# Altium PCB Driver.PcbDoc (part 2 of 4)
Units mm, origin at the board's own origin, x right, y up, seen from the top; angles counter-clockwise.
Board outline 200.2 x 290.2 mm, 2 copper layers (Top Layer, Bottom Layer), stack 1.371 mm thick; 539 components, 196 nets, 1470 pads, 343 vias.
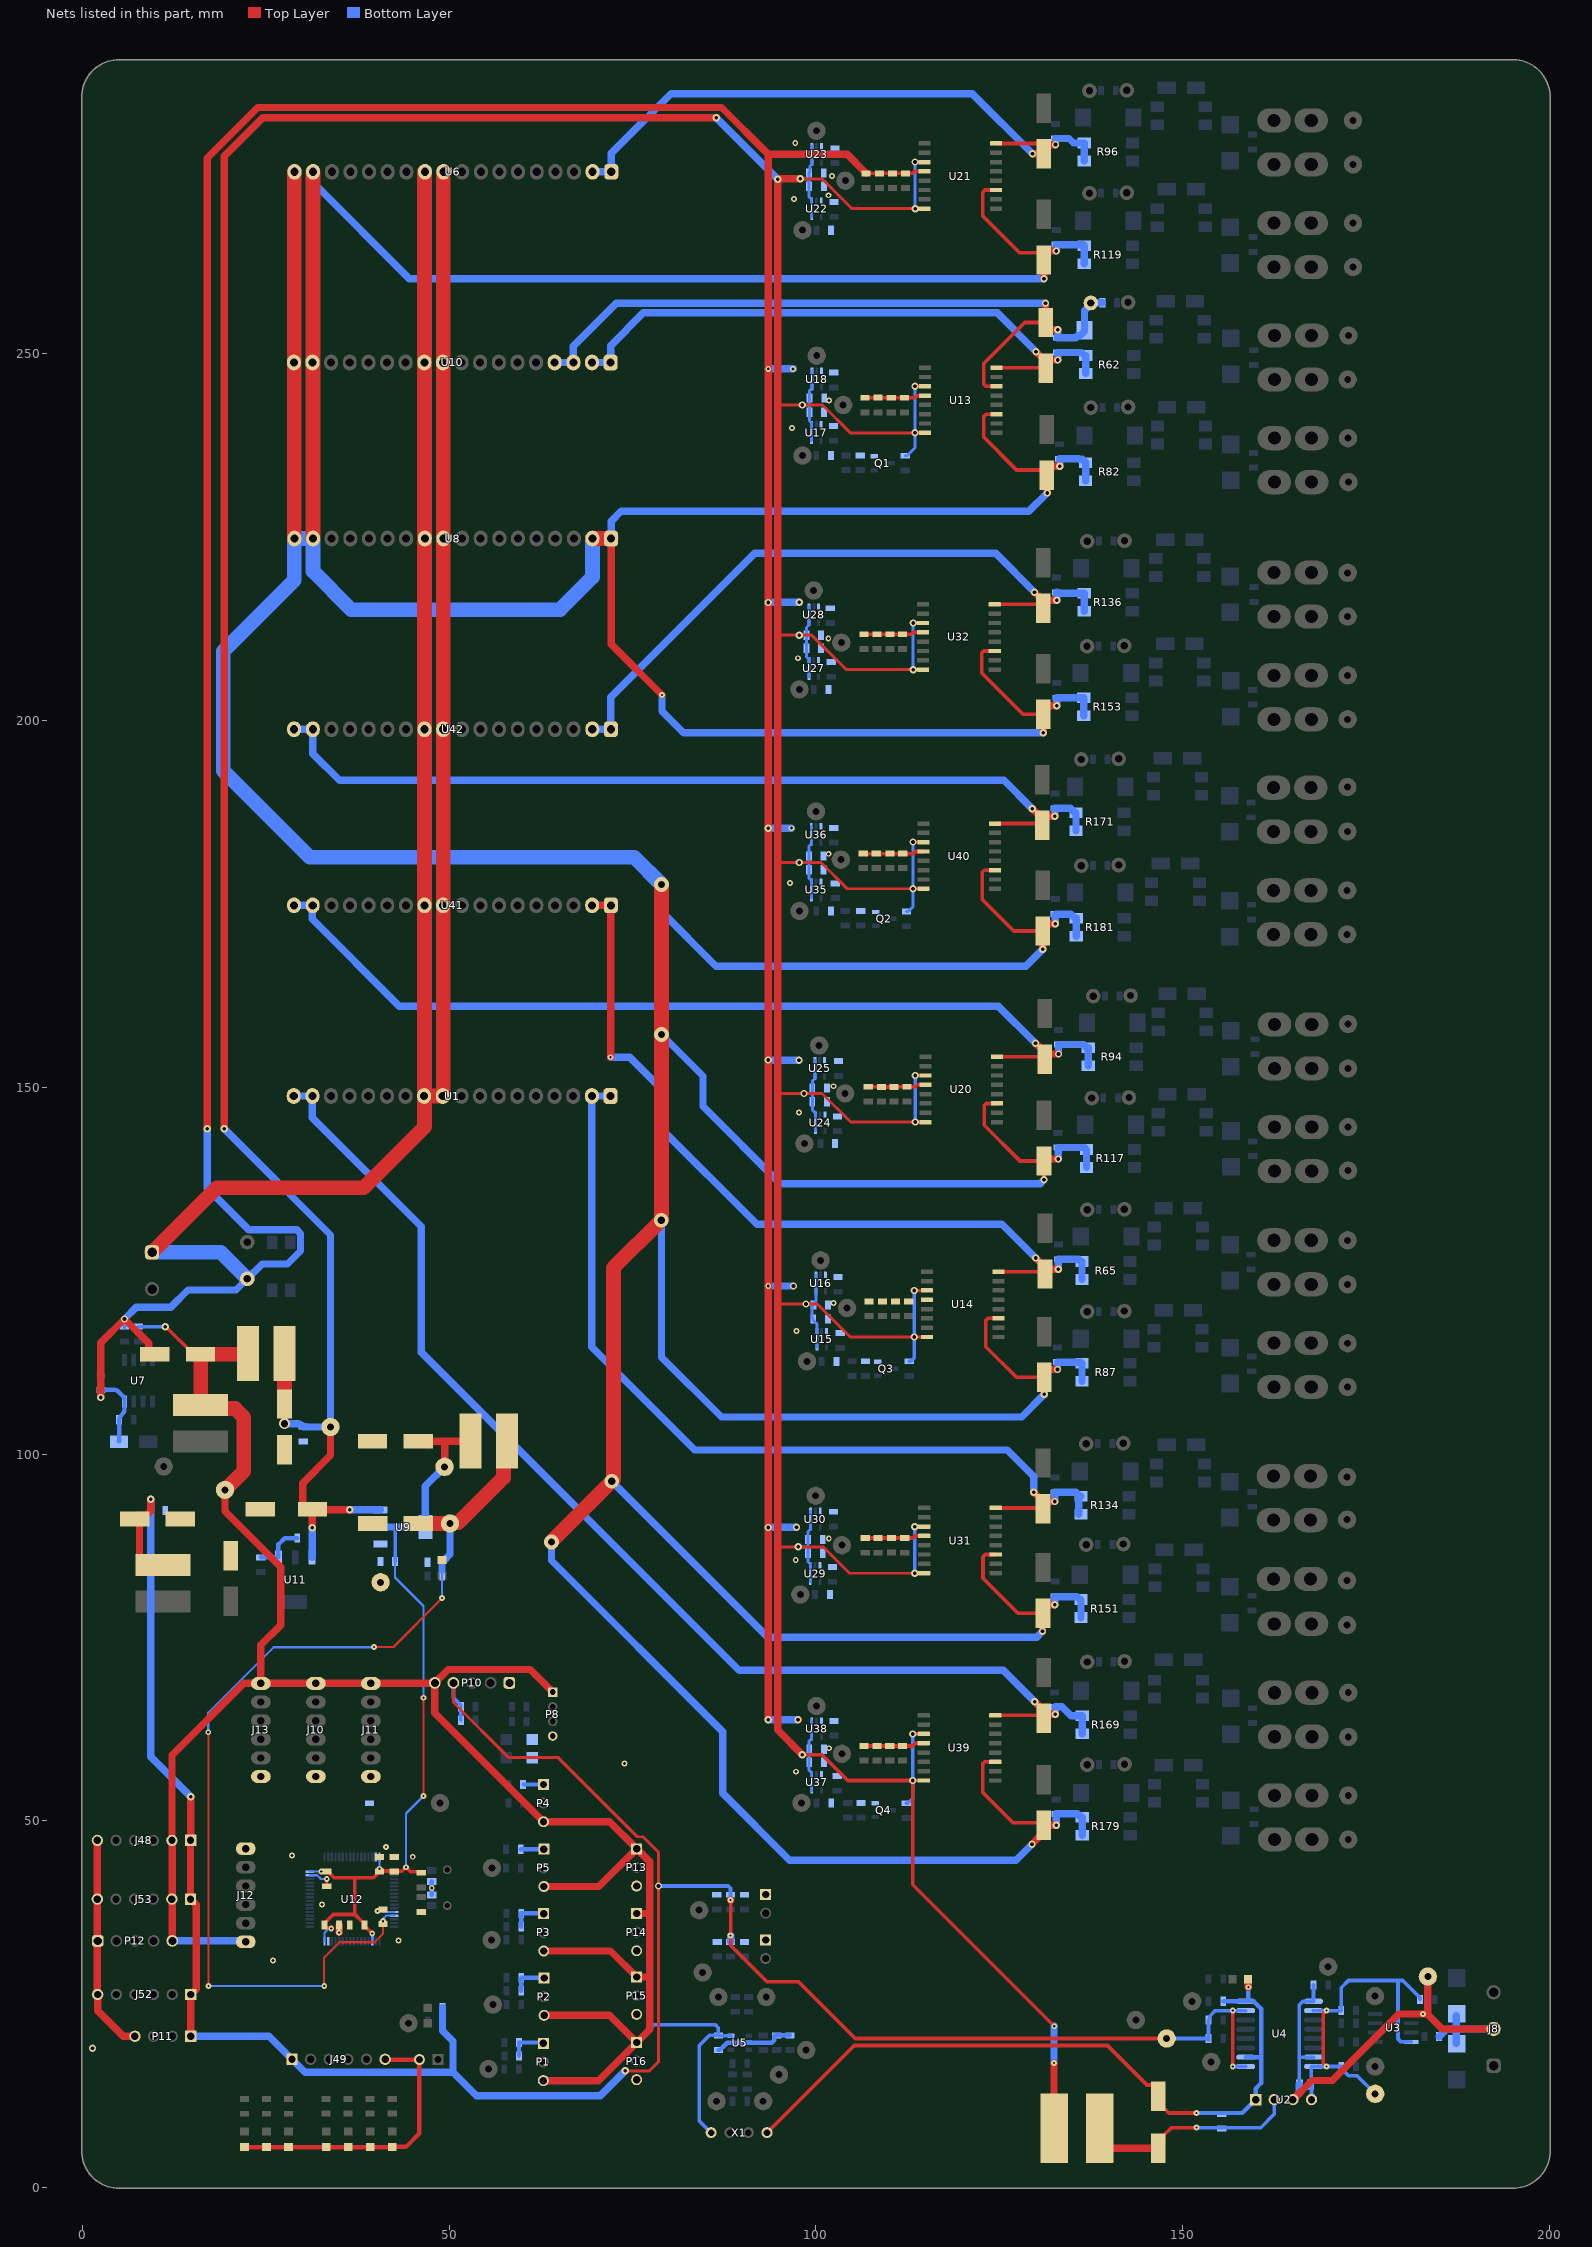
[diagram p2: the nets of this part, all layers, seen from the top]

## Part data
C1 C2 C3 C4 C5 C6 C7 C8 C10 C11 C12 C13 C14 C15 C16 C17 C18 C19 C25 C26 C27 C28 C29 C36 C40 C41 C42 C45 C46 C48 C52 C53 C54 C76 C81 C89 C127: library part CAP-NON-POLAR
C9: library part CMP-1036-04552-2, "CAP CER 0.22UF 50V X7R 0805", Capacitance="0.22 μF", Manufacturer=KEMET, Package=C0805C-DN, Temperature="-55°C to +125°C", Temperature Characteristic=X7R, Temperature Coefficient=30ppm/°C, Temperature Range High=+125°C, Temperature Range Low=-55°C, Tolerance=0.1, Voltage Rating="50 V", Automotive=No, Category=Cap, ComponentLink2Description=Datasheet, ComponentLink2URL=https://content.kemet.com/datasheets/KEM_C1003_C0G_SMD.pdf, Device Class L1="Passive Components", Device Class L2=Capacitors, Device Class L3="Ceramic Capacitors", Digikey Description="CAP CER 0.22UF 50V X7R 0805", Height=0.88mm, Ipc Land Pattern Name=CAPC200125X78, Lead Free=Yes, Manufacturer Part Number=C0805C224K5RACTU, Material=Ceramic, Mouser Description="CAP CER 0.22UF 50V X7R 0805", Octopart=https://octopart.com/c0805c224k5ractu-kemet-144670, RoHS=TRUE
C33 C43 C44 C47 C49 C50 C51 C58 C60 C71 C73 C87 C88 C103 C104 C114 C117 C137 C139 C148 C150 C168 C170: library part CAP-POLAR
C38 C39: library part CAP_POL_SMD
C55 C56: library part CMP-2007-03453-2, "Chip Multilayer Ceramic Capacitors for General Purpose, 0805, 16pF, X5R, 15%, 10%, 16V", Capacitance=10uF, Case Code (Imperial)=0805, Case Code (Metric)=2012, Dielectric=X5R, Max Operating Temperature=85°C, Min Operating Temperature=-55°C, Package Quantity=1, Tolerance=10%, Voltage=16V, Case/Package=0805, Depth=1.25mm, Height=1.25mm, Lead Free="Lead Free", Length=2mm, Material=Ceramic, Mount="Surface Mount", Packaging="Tape and Reel", Radiation Hardening=No, REACH SVHC="No SVHC", Termination=SMD/SMT, Thickness=0.053inch, Voltage Rating=16V, Voltage Rating (DC)=16V, Width=1.25mm
D1 D2 D3 D4 D5 D6 D7 D11 D22: library part LED, "WURTH ELEKTRONIK - 151031YS06000 - LED, Yellow, Through Hole, T-1 (3mm), 30 mA, 2 V, 590 nm", Manufacturer_Name="Wurth Elektronik", Mouser Part Number=710-151031YS06000, Datasheet Link=https://katalog.we-online.de/led/datasheet/151031YS06000.pdf, Geometry.Height=5.5mm, Manufacturer_Part_Number=151031YS06000, Mouser Price/Stock=https://www.mouser.co.uk/ProductDetail/Wurth-Elektronik/151031YS06000?qs=LlUlMxKIyB3xSYYW%252BcuBiQ%3D%3D
D8: "WURTH ELEKTRONIK - 151031YS06000 - LED, Yellow, Through Hole, T-1 (3mm), 30 mA, 2 V, 590 nm", Manufacturer_Name="Wurth Elektronik", Manufacturer_Part_Number=151031YS06000, Mouser Part Number=710-151031YS06000, Datasheet Link=https://katalog.we-online.de/led/datasheet/151031YS06000.pdf, Geometry.Height=5.5mm, Mouser Price/Stock=https://www.mouser.co.uk/ProductDetail/Wurth-Elektronik/151031YS06000?qs=LlUlMxKIyB3xSYYW%252BcuBiQ%3D%3D
J8: library part 691101710003, "WR-TBL Series 101 Horizontal Entry Modular, Through Hole, pitch 5mm, 3p", Manufacturer="Wurth Elektronik", Operating Temperature Max=105°C, Operating Temperature Min=-40°C, Rated Current=16A, Working Voltage=250V, Application="Pressure Clamp", Category="Terminal Blocks", ComponentLink1Description="Manufacturer Link", ComponentLink1URL=https://www.we-online.com/redexpert/article/691101710003?ad, ComponentLink2Description=Datasheet, ComponentLink2URL=https://www.we-online.com/redexpert/spec/691101710003?ad, Manufacturer Part Number=691101710003, Match Code=WR-TBL, Modularity=Yes, Mount="Through Hole", Orientation=Horizontal, Packaging=Box, PCB/Cable/Panel=PCB, Pin Number=3, Pitch=5mm
J9: "WR-TBL Series 101 Horizontal Entry Modular, THT, pitch 5mm, 2p", Manufacturer="Wurth Elektronik", Operating Temperature Max=105°C, Operating Temperature Min=-40°C, Rated Current=16A, Working Voltage=250V, Application="Pressure Clamp", Category="Terminal Blocks", ComponentLink1Description="Website Link", ComponentLink1URL=https://www.we-online.com/redexpert/article/691101710002?ad, ComponentLink2Description="Datasheet Link", ComponentLink2URL=https://www.we-online.com/redexpert/spec/691101710002?ad, Manufacturer Part Number=691101710002, Match Code=WR-TBL, Modularity=Yes, Mount="Through Hole", Number of Pins=2, Number of Rows=1, Orientation=Horizontal, Packaging=Box, Pitch=5mm
J14 J15 J16 J17 J19 J20 J21 J22 J23 J24 J25 J26 J28 J29 J30 J31 J32 J34 J35 J36 J37 J38 J39 J40 J42 J43 J44 J45 J46 J47 J50 J51: library part Klema_15_A
J48 J49 J52 J53: library part SWR25X-NRTC-S06-ST-BA
L3 L4: library part CMP-0227-00501-2, Ambient Temperature Range High=85°C, Ambient Temperature Range Low=-40°C, Current Rating=620mA, DC Resistance (DCR)=500mΩ, Inductance=270µH, Max Operating Temperature=125°C, Self Resonant Frequency=4MHz, Height=5.4mm, Length=9mm, Min Operating Temperature=-40°C, NexarPartId=24533346, Packaging=Digi-Reel®, RoHS=Compliant, Width=10mm
L5 L6 L7: library part 74477530, "WE-PD2 SMT Power Inductor, size 7850, 1000µH, 0.3A, 3.3Ω", Case/Size Code=7850, DC Resistance=2.78Ω, DC Resistance Max=3.3Ω, Inductance=1000µH, Manufacturer="Wurth Elektronik", Operating Temperature Max=125°C, Operating Temperature Min=-40°C, Rated Current=0.3A, Self Resonant Frequency=2.4MHz, Category="Unshielded Power Inductors", ComponentLink1Description="Website Link", ComponentLink1URL=https://www.we-online.com/redexpert/article/74477530?ad, ComponentLink2Description="Datasheet Link", ComponentLink2URL=https://www.we-online.com/redexpert/spec/74477530?ad, Height=4.95mm, Length=7.8mm, Manufacturer Part Number=74477530, Match Code=WE-PD2, Mount="Surface Mount", Packaging="Tape and Reel", Saturation Current=0.3A, Width=7mm
  L6 L7: Simulation ModelName=7850_74477530_1m, Simulation ModelText=".subckt 7850_74477530_1m 1 2 / Rp 1 2 187304.915771 / Cp 1 2 4.36976277949p / Rs 1 N3 3.3 / L1 N3 2 1000u / .ends 7850_74477530_1m", Simulation PortMap=(1:1),(2:2)
P1 P2 P3 P4 P5 P13 P14 P15 P16: "WR-WTB THT Male Vertical Locking Header, pitch 2.54mm, 3p", Contact Resistance=20mOhm, Operating Temperature="-40 to +105degC", Rated Current=3A, Withstanding Voltage=1000VAC, Working Voltage=250VAC, ComponentLink1Description=Manufacturer, ComponentLink1URL=http://www.we-online.de, ComponentLink2Description=Datasheet, ComponentLink2URL=https://www.we-online.com/catalog/datasheet/61900311121.pdf, Gender=Male, Mounting Technology=THT, Packaging=Bag, Part Number=61900311121, Pin Number=3, Pitch=2.54mm, Published Date="January 2020", Publisher="Wurth Elektronik", Type=Vertical
P6 P7 P9: "WR-WTB THT Male Vertical Locking Header, pitch 2.54mm, 2p", Contact Resistance=20mOhm, Operating Temperature="-40 to +105degC", Rated Current=3A, Withstanding Voltage=1000VAC, Working Voltage=250VAC, ComponentLink1Description=Manufacturer, ComponentLink1URL=http://www.we-online.de, ComponentLink2Description=Datasheet, ComponentLink2URL=https://www.we-online.com/catalog/datasheet/61900211121.pdf, Gender=Male, Mounting Technology=THT, Packaging=Bag, Part Number=61900211121, Pin Number=2, Pitch=2.54mm, Published Date="January 2020", Publisher="Wurth Elektronik", Type=Vertical
P8: "WR-WTB Male Vertical Shrouded Header, pitch 2mm, 4p", Contact Resistance=20mOhm, Operating Temperature="-25 to +85degC", Rated Current=2A, Withstanding Voltage=800VAC, Working Voltage=125VAC, ComponentLink1Description=Manufacturer, ComponentLink1URL=http://www.we-online.de, ComponentLink2Description=Datasheet, ComponentLink2URL=https://www.we-online.com/catalog/datasheet/62000411622.pdf, Gender=Male, Mounting Technology=THT, Packaging=Bag, Part Number=62000411622, Pin Number=4, Pitch=2mm, Published Date="January 2020", Publisher="Wurth Elektronik", Type=Vertical
P10 P12: "WR-PHD Pin Header, THT, Vertical, pitch 2.54mm, 1 Row, 5P", Contact Resistance=20mΩ, Manufacturer="Wurth Elektronik", Operating Temperature Max=105°C, Operating Temperature Min=-40°C, Rated Current=3A, Withstanding Voltage=500V, Working Voltage=250V, Category="Board-to-Board Connectors", ComponentLink1Description="Website Link", ComponentLink1URL=https://www.we-online.com/redexpert/article/61300511121?ad, ComponentLink2Description="Datasheet Link", ComponentLink2URL=https://www.we-online.com/redexpert/spec/61300511121?ad, Gender="Pin Header", Manufacturer Part Number=61300511121, Match Code=WR-PHD, Mount="Through Hole", Number of Pins=5, Number of Rows=1, Orientation=Vertical, Packaging=Bag, Pitch=2.54mm
P11: library part CMP-1024-00357-1, "0.025\" SQ Post Header, Through-hole, Vertical, -55 to 125 degC, 2.54 mm Pitch, 4-Pin, Male, RoHS", Manufacturer=Samtec, Temperature Range="-55 to 125 degC", ComponentLink1Description="Manufacturer URL", ComponentLink1URL=http://www.samtec.com, ComponentLink2Description=Datasheet, ComponentLink2URL=http://www.samtec.com/documents/webfiles/pdf/TSW_TH.PDF, ComponentLink3Description="Package Specification", ComponentLink3URL=http://www.samtec.com/documents/webfiles/cpdf/TSW-XXX-XX-XXX-X-XX-XXX-MKT.pdf, DatasheetVersion=F-214, Mounting Technology=Through-hole, Orientation=Vertical, PackageDescription=".025[0.64] SQ. Post Terminal Strip Assembly", PackageReference=TSW-104-08-X-S, PackageVersion="DM, 8/1988", PartNumber=TSW-104-08-G-S, Pitch="2.54 mm", RoHS=True
Q1 Q2 Q3 Q4: library part BC847C_Infineon, "NPN Silicon AF Transistor, 45 V VCEO, 100 mA IC, SOT23, Reel, Green", Manufacturer=Infineon, ComponentLink1Description="Manufacturer URL", ComponentLink1URL=http://www.infineon.com/, ComponentLink2Description=Datasheet, ComponentLink2URL=http://www.infineon.com/dgdl/bc847series_bc848series_bc849series_bc850series.pdf?folderId=db3a304314dca389011541d30fa21656&fileId=db3a304314dca389011541d4630a1657, ComponentLink3Description="Package Specification", ComponentLink3URL=http://www.infineon.com/dgdl/SOT23-Package_Overview.pdf?folderId=db3a30431936bc4b0119532290053c66&fileId=db3a30431936bc4b0119533468123c85, fT (typ)="250Â MHz", Green=TRUE, IBM (max)="200Â mA", IC (max)="100Â mA", ICBO (max)="15Â nA", ICM (max)="200Â mA", Mounting Technology="Surface Mount", PackageDescription="3-Pin Small Outline Transistor Package, 1.3 x 2.9 mm Body, 0.95 mm Pitch", PackageReference=SOT23, PackageVersion=Apr-08, Packing=Reel, PartNumber=BC847C, Polarity=NPN, Ptot (max)="330Â mW", VCBO (max)="50Â V", VCEO (max)="45Â V", VEBO (max)="6Â V"
R1 R2 R3 R4 R5 R6 R7 R8 R9 R10 R11 R12 R13 R22 R23 R24 R25 R26 R27 R28 R29 R30 R32 R36 R38 R39 R40 R41 R49 R50 R51 R52 R53 R54 R55 R57 R58 R59 R60 R61 R62 R63 R64 R65 R66 R67 R68 R69 R70 R71 R72 R73 R74 R75 R76 R77 R78 R81 R82 R83 R84 R86 R87 R88 R89 R90 R91 R92 R93 R94 R95 R96 R97 R98 R99 R100 R101 R102 R103 R104 R105 R106 R107 R108 R111 R113 R114 R115 R116 R117 R118 R119 R120 R121 R122 R123 R124 R125 R126 R127 R128 R129 R130 R131 R132 R133 R134 R135 R136 R137 R140 R142 R143 R144 R145 R146 R147 R148 R149 R150 R151 R152 R153 R154 R157 R159 R160 R161 R162 R163 R164 R165 R166 R167 R168 R169 R170 R171 R172 R173 R175 R176 R177 R178 R179 R180 R181: library part RES-CONST
R56: library part RES-CONST, "10K"
R174: library part RES-CONST, "100K"
TP1 TP2 TP3 TP5 TP6 TP7 TP8 TP9 TP10 TP11 TP13 TP14 TP16 TP20 TP21 TP22 TP23 TP24 TP25 TP26 TP28 TP29 TP30 TP32 TP33 TP34 TP35 TP36 TP37 TP38 TP39 TP40 TP41 TP42 TP43 TP44 TP45 TP49 TP50 TP51 TP52 TP53 TP54 TP55 TP56 TP57 TP58 TP59 TP60 TP61 TP62 TP63 TP67 TP68 TP69 TP70 TP71 TP72 TP73 TP74 TP75 TP76 TP77 TP78 TP79 TP83 TP84 TP85 TP86 TP87 TP88 TP89 TP93 TP94 TP95 TP96 TP97 TP98 TP99 TP100 TP101 TP102 TP103 TP104 TP105: library part TP_PCB?, "Test_Point"
U1 U6 U8 U10 U41 U42: library part DC-DC/12-18VDC
U4: library part CMP-0534-00565-1, "Quad Channel Digital Isolator, 2.5 KV rms Insulation Rating, 10 Mbps Data Rate, 50 ns Delay, Industrial, 16-pin SOIC (RW-16), Tube", Manufacturer="Analog Devices", Max Operating Temp (degreesC)=125, Code_JEDEC=MS-013-AA, ComponentLink1Description="Manufacturer URL", ComponentLink1URL=http://www.analog.com/en/index.html, ComponentLink2Description=Datasheet, ComponentLink2URL=http://www.analog.com/static/imported-files/data_sheets/ADuM1400_1401_1402.pdf, ComponentLink3Description="Package Specification", ComponentLink3URL=http://www.analog.com/static/imported-files/packages/PKG_PDF/SOIC_WIDE%20%28RW%29/RW_16.pdf, ComponentLink4Description="URL Link1", ComponentLink4URL="Product URL:http://www.analog.com/en/interface-isolation/digital-isolators/adum1401/products/product.html", ComponentLink5Description="URL Link2", ComponentLink5URL="Reference Circuit:http://www.analog.com/en/interface-isolation/digital-isolators/adum1401/products/product.html#product-recommendations", DatasheetVersion="Rev. H", Max Data Rate=10Mbps, Mounting Technology="Surface Mount", PackageDescription="16-Pin Standard Small Outline Package, Body 10.3 x 7.5 mm, Pitch 1.27 mm", PackageReference=RW-16, PackageVersion="032707-B, 03/2007", PartNumber=ADUM1401BRWZ
U5: library part MCP6001T, "IC OPAMP GP 1 CIRCUIT SOT23-5", Case/Package=SOT-23, Input Bias Current=1pA, Input Offset Voltage (Vos)=4.5mV, Max Operating Temperature=85°C, Max Supply Voltage=6V, Min Operating Temperature=-40°C, Min Supply Voltage=1.8V, Nominal Supply Current=100uA, Operating Supply Voltage=5.5V, Output Current=23mA, Package Quantity=1, Power Supply Rejection Ratio (PSRR)=86dB, Voltage Gain=112dB, Bandwidth=1MHz, Common Mode Rejection Ratio=60dB, Contact Plating=Tin, Gain Bandwidth Product=1MHz, Height=1.3mm, Lead Free="Lead Free", Length=3.1mm, Mount="Surface Mount", Number of Amplifiers=1, Number of Channels=1, Number of Circuits=1, Number of Elements=1, Number of Pins=5, Operating Supply Current=100uA, Output Current per Channel=23mA, Packaging="Tape and Reel", Radiation Hardening=No, REACH SVHC="No SVHC", Slew Rate=0.6V/µs, Unity Gain Bandwidth Product=1MHz, Voltage=6V, Width=1.8mm
U9 U11: library part AMS1117
VD1 VD18: library part ESD_Unidirect
VD2 VD3 VD6 VD7 VD10 VD11 VD14 VD15 VD20 VD21 VD24 VD25 VD28 VD29 VD32 VD33: library part Suppressor
VD4 VD5 VD8 VD9 VD12 VD13 VD16 VD17 VD22 VD23 VD26 VD27 VD30 VD31 VD34 VD35: library part ZENER
Y1: library part CMP-1749-00004-1, "Resistance Weld Thru-Hole Crystal, 12 MHz, +/-30 ppm, -20 to 70 degC, 2-Pin THD, RoHS, Bulk", Case\Package=TO-251-3, Input Capacitance="350 pF", Max Operating Temperature="150 degC", Max Power Dissipation="2.5 W", Min Operating Temperature="-55 degC", Package Quantity=70, ComponentLink1Description="Manufacturer URL", ComponentLink1URL=http://www.foxonline.com/, ComponentLink2Description=Datasheet, ComponentLink2URL=http://www.foxonline.com/pdfs/hc49slf.pdf, DatasheetVersion=Mar-15, Elements=1, Height="6.1 mm", Length="6.6 mm", Mount="Through Hole", PackageDescription="2-Pin Through Hole Device, Body 11.35 x 4.65 mm, Pitch 4.88 mm", PackageReference=FOXSLF-2, Packaging=Rail/Tube, Pins=3, Radiation Hardening=No, Rds On Max="115 mohm", REACH SVHC="No SVHC", RoHSCompliant=true, Typical Rise Time="90 ns", Width="2.3 mm"

## Via types
v1: diameter 0.8, hole 0.3, Top Layer to Bottom Layer, tented both sides, 172 vias
v2: diameter 1, hole 0.5, Top Layer to Bottom Layer, tented both sides, 129 vias
v3: diameter 0.8, hole 0.4, Top Layer to Bottom Layer, tented both sides, 25 vias
v4: diameter 2, hole 1, Top Layer to Bottom Layer, tented both sides, 11 vias
v5: diameter 0.8, hole 0.4, Top Layer to Bottom Layer, 3 vias
v6: diameter 1, hole 0.5, Top Layer to Bottom Layer, 1 vias
v7: diameter 0.7, hole 0.3, Top Layer to Bottom Layer, tented both sides, 1 vias
v8: diameter 1.5, hole 1, Top Layer to Bottom Layer, tented both sides, 1 vias

## Nets (pads, with @x,y where several pads share a name; then routed paths per layer and width w, separated by ;. In a path a pad name is that pad's centre, name@x,y a point inside that pad or via, vN(x,y) a via of type N, cw(c..) or ccw(c..) an arc to the next point about the centre after c; other vN are vias at no path point)
+3V3: C51.1 C52.2 J48.1 J49.1 J52.1 J53.1 L7.2 P10.4 P11.1 R25.2 R28.2 R78.2 R90.2 R120.2 R121.2 R137.1 R142.2 TP6.1 U4.1 U4.7 | length 347.9
  Top Layer w0.4: P10.4@50.582,68.807 50.582,66.139 58.11,58.611 64.874,58.611 75.655,47.83 76.445,47.83 78.55,45.725 v2(78.55,41.11) 78.525,41.085 78.525,17.15 77.275,15.9 74.025,15.9 v2(74,15.925)
  Top Layer w0.5: v1@88.368,39.175 v1(88.368,34.365) 88.368,33.032 93.325,28.075 97.625,28.075 105.378,20.322 TP6.1@147.823,20.322 ; v1(156.818,16.512) v1(156.818,24.132)
  Top Layer w1: v2(9.3,93.834) 9.3,92.245 8.714,91.659 7.625,91.659 C51.1@7.125,91.159 7.79,90.659 7.79,85.899 L7.2@10.96,84.899 ; J53.1@14.737,39.332 15.512,38.557 15.512,27.062 J52.1@14.782,26.332 P11.1@14.782,20.632 ; J53.1@14.747,39.332 J48.1@14.747,47.332 14.775,47.36 v2(14.775,53.275) ; v1(88.349,39.195) v1@88.368,39.175
  Bottom Layer w0.5: P10.4@50.582,68.807 50.582,66.796 51.442,65.936 51.592,65.786 R120.2@51.592,65.561 R121.2@51.592,63.711 ; v2(78.55,41.11) 88.056,41.11 88.349,40.817 v1(88.349,39.195) ; TP6.1@147.823,20.322 R28.2@153.528,20.322 ; R28.2@153.528,20.097 R28.2@153.528,20.322 ; v1(156.818,16.512) U4.1@158.593,16.512 ; U4.7@158.593,24.132 v1(156.818,24.132) 154.436,24.132 153.678,23.374 153.678,23.012 R25.2@153.528,22.862 R28.2@153.528,20.322
  Bottom Layer w1: v2(9.3,93.834) C52.2@9.3,92.302 9.3,58.75 v2(14.775,53.275) ; P11.1@14.782,20.632 25.441,20.632 30.348,15.725 50.415,15.725 50.525,15.615 ; R142.2@49.087,24.536 R137.1@49.087,22.696 49.087,21.396 50.525,19.958 50.525,15.725 53.725,12.525 70.6,12.525 v2(74,15.925) ; R90.2@88.368,33.505 v1(88.368,34.365)
+3V3_MCU: C21.1 C22.1 C23.1 C24.1 C30.1 C43.1 C46.2 L6.1 R58.2 TP33.1 U9.2 U12.1 U12.19 U12.32 U12.48 U12.64 | length 114.2
  Top Layer w0.3: v1(46.49,53.385) 46.49,66.765 v1(46.5,66.775)
  Top Layer w0.5: v1(32.554,43.076) 33.542,43.076 33.692,42.926 33.692,42.869 34.332,42.228 37.149,42.228 ; v1(33.927,35.311) 33.846,35.311 33.734,35.423 33.157,35.423 33.007,35.573 33.007,36.023 34.213,37.228 37.149,37.228 ; C22.1@38.453,35.572 38.603,35.422 38.722,35.422 v1(39.507,34.637) ; C22.1@38.453,35.797 38.453,36.022 38.303,36.172 38.205,36.172 37.149,37.228 ; C30.1@40.529,43.066 39.691,42.228 37.149,42.228 ; C30.1@40.754,43.161 C21.1@42.507,43.161 ; C21.1@42.545,43.113 43.551,43.113 v1(44.12,43.682) 44.726,43.076 45.527,43.076 45.53,43.074 46.045,43.074 R58.2@46.195,42.924 ; 37.149,37.228 37.149,42.228
  Top Layer w1: C43.1@47.265,101.259 C43.1@45.765,101.759 49.308,101.759 ; TP33.1@49.38,98.269 49.38,101.687 49.308,101.759 ; L6.1@52.88,101.789 52.85,101.759 49.308,101.759
  Bottom Layer w0.3: U12.48@31.007,43.076 v1(32.554,43.076) ; U12.32@33.007,33.576 33.007,34.745 33.461,35.199 33.501,35.199 33.518,35.215 33.831,35.215 v1(33.927,35.311) ; U12.19@39.507,33.576 v1(39.507,34.637) ; v1(40.507,43.473) U12.64@40.507,45.076 ; U12.1@42.507,43.076 42.509,43.078 43.516,43.078 v1(44.12,43.682) 44.12,51.015 v1(46.49,53.385) ; C46.2@42.63,85.339 42.63,83.17 46.5,79.3 v1(46.5,66.775)
  Bottom Layer w0.5: C46.2@42.63,85.339 42.63,90.059
  Bottom Layer w1: U9.2@40.66,90.059 42.63,90.059 U9.2@46.76,90.059 46.76,95.649 TP33.1@49.38,98.269
+3V3_REF: C20.2 C44.1 C45.2 L6.2 R55.2 TP32.1 U12.13 | length 138.6
  Top Layer w0.3: v1(17.15,62.075) 17.175,62.05 v1(17.175,27.5) ; v1(32.975,27.475) 32.95,27.5 32.95,31.353 35.05,33.452 39.855,33.452 40.992,34.589 C20.2@40.992,35.924 C20.2@41.015,35.9 ; v1(39.75,73.7) 42.4,73.7 49.035,80.335 v1(49.035,80.375) ; v1(40.992,36.324) C20.2@41.304,36.011
  Top Layer w2: C44.1@45.805,90.534 TP32.1@50.111,90.534 50.207,90.63 51.255,90.63 57.401,96.776 57.401,101.31 L6.2@57.88,101.789
  Bottom Layer w0.3: v1(17.15,62.075) 17.15,64.75 26.075,73.675 39.725,73.675 v1(39.75,73.7) ; v1(17.175,27.5) 17.2,27.475 v1(32.975,27.475) ; v1(40.992,36.324) 41.087,36.419 41.087,36.746 41.417,37.076 U12.13@42.507,37.076 ; v1(49.035,80.375) 49.035,83.377 49.035,84.139
  Bottom Layer w1: 49.035,84.139 C45.2@49.035,85.247 49.135,85.347 49.135,85.372 49.235,85.472 49.26,85.472 50.111,86.323 TP32.1@50.111,90.534
+5: C4.2 C5.2 C6.2 C7.2 C8.2 C10.2 C11.2 C12.2 C13.2 C14.2 C15.2 C16.2 C17.2 C18.2 C19.2 C39.1 C40.2 C42.2 C49.1 C54.2 C76.2 L3.1 L4.2 R76.1 R104.1 R132.1 R154.1 TP29.1 U9.3 U11.3 U13.3 U13.8 U14.3 U14.8 U15.1 U15.5 U16.1 U16.5 U17.1 U17.5 U18.1 U18.5 U20.3 U20.8 U21.3 U21.8 U22.1 U22.5 U23.1 U23.5 U24.1 U24.5 U25.1 U25.5 U27.1 U27.5 U28.1 U28.5 U29.1 U29.5 U30.1 U30.5 U31.3 U31.8 U32.3 U32.8 U35.1 U35.5 U36.1 U36.5 U37.1 U37.5 U38.1 U38.5 U39.3 U39.8 U40.3 U40.8 | length 912.1
  Top Layer w0.4: 94.775,87.355 94.779,87.355 v2(97.614,87.355) 100.977,87.355 104.577,83.755 v2(113.474,83.755) 113.481,83.763 114.761,83.763 U31.8@114.769,83.77 ; 94.775,120.454 v2(98.649,120.454) 100.175,120.454 104.67,115.959 v2(113.407,115.959) U14.8@115.141,115.959 ; 94.775,149.167 98.372,149.167 v2(98.374,149.169) 98.376,149.167 100.835,149.167 104.738,145.264 v2(113.564,145.264) U20.8@114.939,145.264 ; 94.775,180.654 v2(97.733,180.654) 100.698,180.654 104.283,177.069 v2(113.233,177.069) U40.8@114.678,177.069 ; 94.775,211.857 94.991,211.641 v2(97.741,211.641) 99.436,211.641 104.128,206.949 v2(113.249,206.949) U32.8@114.625,206.949 ; 94.775,243.022 v2(98.154,243.022) 100.888,243.022 104.687,239.223 v2(113.512,239.223) U13.8@114.887,239.223 ; v2(97.867,273.846) 100.864,273.846 104.922,269.788 v2(113.529,269.788) U21.8@114.815,269.788 ; v2(113.198,55.5) U39.8@114.699,55.5 ; v2(113.198,61.85) U39.3@114.699,61.85 ; v2(113.243,183.444) 113.26,183.427 114.67,183.427 U40.3@114.678,183.419 ; v2(113.25,213.299) U32.3@114.625,213.299 ; v2(113.407,122.309) U14.3@115.141,122.309 ; v2(113.474,90.115) 113.476,90.118 114.766,90.118 U31.3@114.769,90.12 ; v2(113.508,276.138) U21.3@114.815,276.138 ; v2(113.512,245.573) U13.3@114.887,245.573 ; v2(113.564,151.614) U20.3@114.939,151.614
  Top Layer w0.5: v2(98.145,59.008) 100.821,59.008 104.329,55.5 v2(113.198,55.5) ; v2@113.198,55.33 113.198,41.302 v1(132.5,22)
  Top Layer w1: v2(19.35,144.35) 19.35,276.95 24.575,282.175 v2(86.4,282.175) ; v8(27.55,104.139) 27.563,105.322 C39.1@27.561,105.546 ; v2(31.33,89.979) 31.33,92.429 C49.1@31.36,92.459 ; C49.1@32.36,92.419 v2(36.45,92.419) ; C49.1@32.36,92.459 C49.1@31.36,92.459 ; TP29.1@33.83,103.339 33.83,99.832 30.04,96.042 30.04,92.959 30.54,92.459 C49.1@31.36,92.459 ; 94.775,87.355 94.775,120.454 94.775,149.167 94.775,180.654 94.775,211.857 94.775,243.022 v2(94.775,273.8) 94.821,273.846 v2(97.867,273.846) ; 94.779,87.355 94.779,62.374 v2(98.145,59.008) ; v1(132.45,16.975) 132.45,8.084 L3.1@132.46,8.074
  Top Layer w2: C39.1@27.55,106.822 L4.2@27.55,113.729
  Bottom Layer w0.4: v2(97.614,87.355) 98.939,87.355 ; v2(97.733,180.654) 97.743,180.644 98.895,180.644 99.044,180.793 ; v2(97.741,211.641) C76.2@98.701,211.641 ; v2(97.867,273.846) 98.982,273.846 99.067,273.761 ; v2(98.145,59.008) 99.084,59.008 ; v2(98.154,243.022) 98.934,243.022 99.112,243.199 ; v2(98.374,149.169) 99.505,149.169 99.507,149.167 ; v2(98.649,120.454) 99.456,120.454 99.476,120.434 C6.2@99.476,120.315 ; U27.5@99.051,205.976 U27.1@99.051,208.226 99.051,208.451 98.935,208.451 98.701,208.685 C4.2@98.701,209.861 C76.2@98.701,211.641 98.701,212.701 99.081,213.081 U28.5@99.081,213.306 U28.1@99.081,215.556 ; U29.5@99.229,82.592 U29.1@99.229,84.842 99.229,85.067 99.174,85.067 98.939,85.301 C11.2@98.939,86.487 98.939,87.355 ; U30.1@99.289,92.262 U30.5@99.289,90.012 99.289,89.787 98.939,89.436 C8.2@98.939,88.337 98.939,87.355 ; U36.1@99.367,185.587 U36.5@99.367,183.337 99.367,183.112 99.278,183.112 99.044,182.877 C18.2@99.044,181.555 99.044,180.793 ; U35.5@99.377,175.787 U35.1@99.377,178.037 99.377,178.262 99.278,178.262 99.044,178.496 C16.2@99.044,179.652 99.044,180.793 ; U17.5@99.411,238.146 U17.1@99.411,240.396 99.411,240.621 99.346,240.621 99.112,240.855 C14.2@99.112,242.041 99.112,243.199 ; U22.5@99.43,268.652 U22.1@99.43,270.902 99.43,271.127 99.314,271.127 99.08,271.361 C15.2@99.08,272.841 99.067,272.854 99.067,273.761 ; U38.1@99.434,63.655 U38.5@99.434,61.405 99.434,61.18 99.384,61.18 99.084,60.88 C17.2@99.084,59.77 99.084,59.008 ; U37.5@99.434,54.14 U37.1@99.434,56.39 99.434,56.615 99.318,56.615 99.084,56.85 C19.2@99.084,57.98 99.084,59.008 ; U23.1@99.437,278.307 U23.5@99.437,276.057 99.437,275.832 99.211,275.606 99.211,274.811 C13.2@99.067,274.668 99.067,273.761 ; U18.1@99.462,247.686 U18.5@99.462,245.436 99.462,245.211 99.375,245.211 99.141,244.977 C12.2@99.141,243.961 99.112,243.932 99.112,243.199 ; C6.2@99.656,120.315 C6.2@99.476,120.315 ; C6.2@99.656,120.54 99.986,120.87 U16.5@99.986,122.184 U16.1@99.986,124.434 ; U25.1@99.857,153.694 U25.5@99.857,151.444 99.857,151.219 99.558,150.92 99.558,149.98 C7.2@99.507,149.929 99.507,149.167 ; U24.5@99.914,144.044 U24.1@99.914,146.294 99.914,146.519 99.507,146.926 C10.2@99.507,148.03 99.507,149.167 ; U15.5@100.121,114.519 U15.1@100.121,116.769 100.121,117.76 99.887,117.994 99.836,117.994 99.636,118.194 C5.2@99.636,118.419 99.476,118.579 C6.2@99.476,120.315 ; R76.1@112.186,236.097 112.411,236.097 113.512,237.198 v2(113.512,239.223) v2(113.512,245.573) ; R104.1@112.348,173.957 112.573,173.957 113.233,174.617 v2(113.233,177.069) 113.243,177.079 v2(113.243,183.444) ; v2(113.249,206.949) 113.249,213.298 v2(113.25,213.299) ; v2(113.508,276.138) 113.508,269.809 v2(113.529,269.788)
  Bottom Layer w0.5: R154.1@112.309,52.39 112.534,52.39 113.198,53.054 v2(113.198,55.5) v2(113.198,61.85) ; R132.1@112.723,112.654 112.948,112.654 113.407,113.113 v2(113.407,115.959) v2(113.407,122.309) ; v2(113.474,83.755) v2(113.474,90.115) ; v2(113.564,145.264) v2(113.564,151.614)
  Bottom Layer w1: v2(19.35,144.35) 33.83,129.87 TP29.1@33.83,103.699 30.14,103.699 C40.2@30.1,103.739 29.992,103.847 ccw(c29.286,103.139) 29.286,104.139 v8(27.55,104.139) ; U11.3@31.32,85.919 31.32,88.539 31.33,88.549 v2(31.33,89.979) ; v2(36.45,92.419) U9.3@40.6,92.419 ; v2(86.4,282.175) v2(94.775,273.8) ; v1(132.45,16.975) 132.45,21.95 v1(132.5,22)
+5V_1: C25.2 C38.1 J10.6 J11.6 J12.6 J13.6 J48.2 J53.2 L4.1 L5.2 P1.3 P2.3 P3.3 P4.3 P5.3 P8.1 P10.5 P12.5 P13.1 P14.1 P15.1 P16.1 R56.1 TP30.1 U5.5 X1.1 | length 324.4
  Top Layer w0.5: v2(11.3,117.375) 11.354,117.375 15.1,113.629 C38.1@16.1,113.629 ; J48.2@12.207,47.332 J48.2@12.257,47.282
  Top Layer w1: J48.2@12.207,47.332 12.207,58.932 22.012,68.737 J13.6@24.328,68.737 ; P12.5@12.257,33.632 J48.2@12.257,47.282 ; TP30.1@19.45,95.125 19.45,92.189 27.025,84.614 27.025,76.674 24.328,73.977 J13.6@24.328,68.737 ; P1.3@62.842,14.587 70.352,14.587 P16.1@75.555,19.79 ; P3.3@62.893,32.262 71.998,32.262 P15.1@75.555,28.705 77.325,28.705 ; P5.3@62.917,41.051 70.416,41.051 P13.1@75.555,46.19 ; P2.3@62.943,23.487 71.858,23.487 P16.1@75.555,19.79 ; P8.1@64.122,67.561 61.051,70.632 49.867,70.632 P10.5@48.042,68.807 ; P14.1@75.555,37.375 77.325,37.375 ; J13.6@24.328,68.737 J10.6@31.828,68.737 J11.6@39.328,68.737 47.972,68.737 P10.5@48.042,68.807 ; P10.5@48.042,68.807 48.042,64.706 P4.3@62.867,49.881 71.864,49.881 P13.1@75.555,46.19 ; P16.1@75.555,19.79 77.325,21.56 77.325,28.705 ; P13.1@75.555,46.19 77.325,44.42 77.325,37.375 ; 77.325,28.705 77.325,37.375
  Top Layer w2: C38.1@16.1,113.629 C38.1@16.12,113.629 ; TP30.1@19.45,95.125 22,97.675 22,105.037 20.828,106.209 16.62,106.209 L5.2@16.12,106.709 C38.1@16.12,113.629 ; L4.1@22.55,113.729 22.45,113.629 C38.1@16.12,113.629
  Bottom Layer w0.5: R56.1@7.64,117.369 11.294,117.369 v2(11.3,117.375) ; P16.1@75.555,19.79 77.95,22.185 86.315,22.185 86.703,21.797 C25.2@86.703,20.755 85.499,20.755 84.112,19.368 84.112,9.093 X1.1@85.712,7.493 ; C25.2@86.753,20.705 U5.5@88.43,20.705
  Bottom Layer w1: P12.5@12.257,33.632 22.147,33.632 J12.6@22.272,33.507
+5V_ISO: C9.1 R24.2 R26.2 R27.2 TP5.1 U2.4 U3.8 U4.10 U4.16 | length 52.1
  Top Layer w0.5: v1(169.613,16.512) 169.586,16.512 169.143,16.955 169.143,23.657 v1(169.618,24.132)
  Bottom Layer w0.5: U2.4@167.568,11.997 167.568,14.072 167.543,14.097 167.543,16.42 167.635,16.512 U4.16@167.843,16.512 167.848,16.517 169.608,16.517 v1(169.613,16.512) 169.618,16.517 171.608,16.517 R27.2@171.613,16.512 ; U4.10@167.843,24.132 v1(169.618,24.132) ; v1(169.618,24.132) R26.2@171.618,24.132 171.618,27.231 172.618,28.231 179.344,28.231 ; R27.2@171.618,16.517 171.768,16.367 171.768,16.117 172.618,15.267 173.764,15.267 TP5.1@176.248,12.783 ; U3.8@181.153,19.862 179.753,19.862 179.344,20.271 179.344,28.231 ; R24.2@182.358,25.657 182.358,25.882 180.009,28.231 179.344,28.231
+5V_RS: C33.1 C34.2 L3.2 U2.2 | length 30.1
  Top Layer w0.5: L3.2@138.71,8.074 138.71,6.976 L3.2@140.335,5.351 ; C33.1@146.675,5.351 147.425,6.101 147.425,7.125 148.475,8.175 v1(151.9,8.175)
  Top Layer w1: L3.2@140.335,5.351 C33.1@146.675,5.351
  Bottom Layer w0.5: v1(151.9,8.175) 160.64,8.175 162.488,10.023 U2.2@162.488,11.997
+24V_1: C57.2 C58.1 R62.2 U10.1 U10.2 U13.16 | length 85.8
  Top Layer w0.5: U13.16@124.637,248.113 131.262,248.113 C58.1@131.322,248.053
  Top Layer w1: v2(130,250.3) 130.747,249.553 130.822,249.553 131.322,249.053 C58.1@131.322,248.648 ; C58.1@131.322,248.053 C58.1@131.322,248.648 ; v2(132.982,249.148) 131.822,249.148 C58.1@131.322,248.648
  Bottom Layer w1: U10.2@69.47,248.815 U10.1@72.01,248.815 72.01,251.11 76.475,255.575 124.725,255.575 v2(130,250.3) ; v2(132.982,249.148) 132.982,250.147 C57.2@132.942,250.188 136.181,250.188 136.606,249.763 R62.2@136.781,249.763 R62.2@136.781,247.313
+24V_2: C70.2 C71.1 C72.2 C73.1 C101.2 C102.2 C103.1 C104.1 C136.2 C137.1 C138.2 C139.1 C167.2 C168.1 C169.2 C170.1 R82.2 R87.2 R117.2 R119.2 R151.2 R153.2 R179.2 R181.2 U6.17 U6.18 U8.1 U8.2 U8.17 U8.18 U10.17 U10.18 U13.11 U14.11 U20.11 U21.11 U31.11 U32.11 U39.11 U40.11 | length 1185.4
  Top Layer w0.5: U32.11@124.375,209.489 122.888,209.489 122.595,209.196 122.595,206.499 128.235,200.859 C139.1@131,200.859 130.368,200.227 C139.1@130.368,199.475 ; U40.11@124.428,179.609 122.976,179.609 122.683,179.316 122.683,175.594 126.968,171.309 C170.1@130.933,171.309 C170.1@130.925,171.301 ; U39.11@124.449,58.04 123.017,58.04 122.724,57.747 122.724,53.905 126.875,49.754 C168.1@131.074,49.754 ; U31.11@124.519,86.31 123.077,86.31 122.784,86.017 122.784,83.086 127.563,78.307 C137.1@130.954,78.307 ; U21.11@124.565,272.328 123.033,272.328 122.74,272.035 122.74,268.793 127.735,263.798 C104.1@131.05,263.798 ; U13.11@124.637,241.763 123.195,241.763 122.902,241.47 122.902,238.608 127.35,234.16 130.765,234.16 C71.1@131.11,233.815 ; U20.11@124.689,147.804 123.247,147.804 122.954,147.511 122.954,144.819 127.809,139.964 C103.1@131.104,139.964 ; U14.11@124.891,118.499 123.449,118.499 123.156,118.206 123.156,114.645 127.342,110.459 C73.1@131.126,110.459 C73.1@131.15,110.435 ; C170.1@130.938,171.569 C170.1@131.683,172.314 ; v2(131.1,137.4) 131.1,138.468 130.354,139.214 C103.1@131.104,139.964 ; C103.1@131.359,140.219 C103.1@131.104,139.964
  Top Layer w1: U6.18@28.9,274.795 U6.18@28.92,274.815 ; U6.17@31.44,274.795 U6.17@31.46,274.815 ; U8.1@72.08,224.815 72.08,210.42 v1(79.025,203.475) ; v2(129.45,46.825) 130.505,47.88 130.574,47.88 131.074,48.38 C168.1@131.074,49.38 ; v2(130.9,75.85) 130.9,78.253 C137.1@130.954,78.307 130.954,78.945 131.454,79.445 v2(132.559,79.445) ; v2(130.925,168.825) C170.1@130.925,171.301 ; v2(131,198.325) C139.1@131,200.859 131,201.524 131.5,202.024 v2(132.85,202.024) ; v2(131.1,260.225) 131.1,262.748 C104.1@131.05,262.798 131.05,263.513 131.55,264.013 v2(132.77,264.013) ; C71.1@131.11,233.815 131.525,233.4 v2(131.525,231.025) ; C168.1@131.115,49.422 v2(132.764,49.422) ; C73.1@131.126,110.459 131.126,111.029 131.626,111.529 v2(132.926,111.529) ; v2(131.15,108.15) C73.1@131.15,110.435 ; C103.1@131.359,140.219 v2(133.044,140.219) ; C71.1@131.472,233.453 131.472,234.178 131.972,234.678 v2(133.262,234.678) ; C170.1@131.683,172.314 v2(132.623,172.314)
  Top Layer w2: U8.18@28.9,224.815 U6.18@28.9,274.795 ; U8.17@31.44,224.815 U6.17@31.44,274.795 ; v4(63.95,88.025) 63.95,88.075 v4(72.175,96.3) ; U8.2@69.54,224.815 U8.1@72.08,224.815 ; v4@72.4,96.525 72.4,125.375 v4(78.9,131.875) 78.95,131.925 v4(78.95,157.2) v4(78.95,177.65)
  Bottom Layer w0.5: C101.2@133.004,141.789 C101.2@133.044,141.749 ; R117.2@136.634,141.789 R117.2@136.899,141.524
  Bottom Layer w1: U6.17@31.46,274.815 31.52,274.755 31.52,273.28 44.575,260.225 v2(131.1,260.225) ; v4(63.95,88.025) 63.95,85.5 87.3,62.15 87.3,53.75 96.4,44.65 127.275,44.65 v2(129.45,46.825) ; U8.2@69.54,224.815 U8.1@72.08,224.815 72.08,227.18 73.425,228.525 129.025,228.525 v2(131.525,231.025) ; v4(72.175,96.3) 93.43,75.045 130.095,75.045 v2(130.9,75.85) ; v4(78.9,131.875) 78.95,131.825 78.95,113.221 87.121,105.05 128.05,105.05 v2(131.15,108.15) ; v4(78.95,157.2) 84.6,151.55 84.6,147.4 95.125,136.875 130.575,136.875 v2(131.1,137.4) ; v4(78.95,177.65) 78.894,177.594 78.894,174.006 86.375,166.525 128.625,166.525 v2(130.925,168.825) ; v1(79.025,203.475) 79.025,201.25 81.95,198.325 v2(131,198.325) ; v2(132.559,79.445) C136.2@132.559,80.581 ; v2(132.623,172.314) C169.2@132.623,173.554 ; C136.2@132.709,80.57 135.564,80.57 135.964,80.17 R151.2@136.139,80.17 R151.2@136.139,77.72 R151.2@136.139,77.708 ; C169.2@132.748,173.584 134.768,173.584 135.313,173.039 R181.2@135.488,173.039 R181.2@135.488,170.589 ; v2@132.764,49.795 C167.2@132.764,50.905 ; v2(132.77,264.013) C102.2@132.77,264.883 136.45,264.883 R119.2@136.595,264.738 R119.2@136.595,262.288 ; C167.2@132.774,50.975 135.619,50.975 135.899,50.695 136.074,50.695 R179.2@136.299,50.47 R179.2@136.299,48.02 ; v2(132.85,202.024) C138.2@132.85,203.114 ; C138.2@132.922,203.041 132.979,203.098 R153.2@136.525,203.098 R153.2@136.525,200.648 ; v2(132.926,111.529) C72.2@132.926,112.529 136.116,112.529 R87.2@136.281,112.364 R87.2@136.281,109.914 ; C101.2@133.004,141.789 R117.2@136.634,141.789 ; v2(133.044,140.219) C101.2@133.044,141.749 ; v2(133.262,234.678) 133.262,235.637 C70.2@133.222,235.678 135.824,235.678 135.874,235.628 136.292,235.628 R82.2@136.767,235.153 R82.2@136.767,232.703 ; R117.2@136.899,139.074 R117.2@136.899,141.524
  Bottom Layer w2: U8.2@69.54,224.815 69.54,219.54 65.1,215.1 36.68,215.1 31.44,220.34 U8.17@31.44,224.815 U8.18@28.9,224.815 28.9,219.125 19.225,209.45 19.225,193.15 31.025,181.35 75.25,181.35 v4(78.95,177.65)
+24V_3: C86.2 C88.1 R96.2 U6.1 U6.2 U21.16 | length 87.4
  Top Layer w0.5: U21.16@124.565,278.678 130.24,278.678 C88.1@130.99,277.928 ; C88.1@131.05,277.26 131.05,277.773 C88.1@131.8,278.523
  Top Layer w1: v2(129.526,277.26) C88.1@131.05,277.26 ; C88.1@131.8,278.523 v2(132.66,278.523)
  Bottom Layer w0.5: v2(132.66,278.523) v2@132.67,278.532 ; C86.2@132.67,279.333 C86.2@132.68,279.343
  Bottom Layer w1: U6.2@69.56,274.815 U6.1@72.1,274.815 72.1,277.325 80.25,285.475 121.311,285.475 v2(129.526,277.26) ; v2@132.67,278.532 C86.2@132.67,279.333 ; C86.2@132.68,279.343 134.509,279.343 135.114,278.738 R96.2@136.595,278.738 R96.2@136.595,276.288
+24V_4: C115.2 C117.1 R136.2 U32.16 U42.1 U42.2 | length 93.7
  Top Layer w0.5: U32.16@124.375,215.839 130.45,215.839 130.703,215.586 C117.1@131,215.289
  Top Layer w1: v2(129.8,217.5) 130.5,216.8 130.5,216.384 C117.1@131,215.884 ; C117.1@131,215.289 C117.1@131,215.884 ; v2(132.83,216.384) 131.5,216.384 C117.1@131,215.884
  Bottom Layer w1: U42.2@69.51,198.815 U42.1@72.05,198.815 72.05,203.175 91.675,222.8 124.5,222.8 v2(129.8,217.5) ; C115.2@132.81,217.484 132.83,217.463 v2(132.83,216.384) ; C115.2@132.98,217.339 R136.2@136.585,217.339 R136.2@136.585,214.889
+24V_5: C149.2 C150.1 R171.2 U40.16 U42.17 U42.18 | length 125.1
  Top Layer w0.5: U40.16@124.428,185.959 C150.1@130.633,185.959
  Top Layer w1: v2(129.5,188) 130.281,187.219 130.373,187.219 130.873,186.719 C150.1@130.873,186.434 ; C150.1@130.633,185.959 C150.1@130.873,185.719 C150.1@130.873,186.434 ; v2(132.566,186.934) 131.373,186.934 C150.1@130.873,186.434
  Bottom Layer w1: U42.18@28.87,198.815 U42.17@31.41,198.815 31.41,195.49 35.05,191.85 125.65,191.85 v2(129.5,188) ; v2(132.566,186.934) 132.566,187.569 132.566,188.027 C149.2@132.593,188.054 134.678,188.054 135.283,187.449 R171.2@135.458,187.449 R171.2@135.458,184.999
+24V_6: C59.2 C60.1 R65.2 U14.16 U41.1 U41.2 | length 116.4
  Top Layer w0.5: U14.16@124.891,124.849 C60.1@130.931,124.849 ; C60.1@130.59,125.968 131.236,125.322 C60.1@131.236,124.544 ; C60.1@130.938,125.307 131.125,124.951 131.304,124.612 C60.1@131.236,124.544 ; C60.1@131.891,125.199 C60.1@131.236,124.544
  Top Layer w1: U41.2@69.5,174.815 U41.1@72.04,174.815 72.04,154.15 v1(71.99,154.1) ; v2(129.975,126.725) 130.661,126.039 130.736,126.039 131.236,125.539 C60.1@131.236,124.544 ; C60.1@131.891,125.199 v2(133.046,125.199)
  Bottom Layer w0.5: C59.2@133.046,126.549 C59.2@133.056,126.559
  Bottom Layer w1: v1(71.99,154.1) 74.625,154.1 78.525,150.2 78.525,144.775 91.975,131.325 125.375,131.325 v2(129.975,126.725) ; v2(133.046,125.199) C59.2@133.046,126.549 ; C59.2@133.056,126.559 135.796,126.559 136.106,126.249 R65.2@136.281,126.249 R65.2@136.281,123.799
+24V_7: C85.2 C87.1 R94.2 U20.16 U41.17 U41.18 | length 129.6
  Top Layer w0.5: U20.16@124.689,154.154 130.884,154.154 C87.1@131.194,153.844 ; v2(129.925,156.025) v2@129.937,156.025 ; C87.1@130.368,155.594 130.444,155.594 131.194,154.844 C87.1@131.194,153.844 ; C87.1@131.899,154.549 C87.1@131.194,153.844
  Top Layer w1: v2@129.937,156.025 C87.1@130.368,155.594 ; C87.1@131.899,154.549 v2(133.074,154.549)
  Bottom Layer w0.5: U41.17@31.325,174.74 U41.17@31.4,174.815 ; C85.2@133.064,155.839 C85.2@133.074,155.829
  Bottom Layer w1: U41.18@28.86,174.815 U41.17@31.4,174.815 ; U41.17@31.325,174.74 31.325,172.95 43.2,161.075 124.875,161.075 v2(129.925,156.025) ; C85.2@133.064,155.839 136.509,155.839 136.944,155.404 R94.2@137.119,155.404 R94.2@137.119,152.954 ; v2(133.074,154.549) C85.2@133.074,155.829
+24V_8: C113.2 C114.1 R134.2 U1.1 U1.2 U31.16 | length 125.1
  Top Layer w0.3: C114.1@130.864,92.66 C114.1@130.954,92.57
  Top Layer w0.5: U31.16@124.519,92.66 C114.1@130.864,92.66
  Top Layer w1: v2(129.675,94.8) 130.405,94.07 130.454,94.07 130.954,93.57 C114.1@130.954,93.025 ; C114.1@130.954,92.57 C114.1@130.954,93.025 ; v2(132.574,93.525) 131.454,93.525 C114.1@130.954,93.025
  Bottom Layer w1: U1.1@71.99,148.815 U1.2@69.45,148.815 69.45,114.6 83.5,100.55 126.075,100.55 129.675,96.95 v2(129.675,94.8) ; v2(132.574,93.525) C113.2@132.574,94.693 ; C113.2@132.574,94.793 135.421,94.793 135.964,94.25 R134.2@136.139,94.25 ; R134.2@135.839,91.8 R134.2@135.839,94.373
+24V_9: C147.2 C148.1 R169.2 U1.17 U1.18 U39.16 | length 165.6
  Top Layer w0.5: U39.16@124.369,64.39 U39.16@124.449,64.39 130.684,64.39 C148.1@131.074,64
  Top Layer w1: v2(129.85,66.225) 130.574,65.501 130.574,64.5 130.684,64.39 C148.1@131.074,64 131.074,64.039 131.574,64.539 v2(132.615,64.539)
  Bottom Layer w1: U1.18@28.81,148.815 U1.17@31.35,148.815 31.35,145.85 46.175,131.025 46.175,113.875 89.475,70.575 89.581,70.575 89.636,70.52 125.555,70.52 v2(129.85,66.225) ; v2(132.615,64.539) 132.615,65.109 ; C147.2@132.615,65.575 133.544,65.575 134.775,64.344 R169.2@136.299,64.344 R169.2@136.299,61.894
GND: C1.1 C2.1 C3.1 C4.1 C5.1 C6.1 C7.1 C8.1 C10.1 C11.1 C12.1 C13.1 C14.1 C15.1 C16.1 C17.1 C18.1 C19.1 C20.1 C21.2 C22.2 C23.2 C24.2 C25.1 C28.1 C30.2 C33.2 C34.1 C36.2 C38.2 C39.2 C40.1 C41.2 C42.1 C43.2 C44.2 C45.1 C46.1 C47.2 C48.1 C49.2 C50.2 C51.2 C52.1 C53.1 C54.1 C55.2 C56.2 C64.1 C65.1 C68.1 C69.1 C76.1 C81.1 C89.1 C95.1 C96.1 C97.1 C98.1 C124.1 C125.1 C126.1 C127.1 C155.1 C156.1 C159.1 C162.1 D1.2 D2.2 D3.2 D4.2 D5.2 D6.2 D7.2 D8.2 D10.2 D11.2 J9.1 J10.1 J11.1 J12.1 J13.1 J48.6 J49.6 J52.6 J53.6 P1.1 P2.1 P3.1 P4.1 P5.1 P6.1 P7.1 P8.4 P9.2 P10.1 P11.4 P12.1 P13.3 P14.3 P15.3 P16.3 Q1.2 Q2.2 Q3.2 Q4.2 R4.2 R5.2 R6.2 R29.1 R30.1 R40.1 R52.2 R57.1 R59.1 R66.1 R67.1 R68.1 R69.1 R70.1 R71.1 R72.1 R73.1 R74.1 R75.1 R88.2 R89.2 R97.1 R98.1 R99.1 R100.1 R101.1 R102.1 R103.2 R105.1 R106.1 R107.1 R108.1 R113.2 R125.1 R126.1 R127.1 R128.1 R129.1 R130.1 R143.2 R144.1 R145.1 R146.1 R147.1 R159.2 R161.1 R162.1 R163.1 R164.1 R165.1 R166.1 R172.1 R173.1 R174.1 R175.1 TP34.1 U1.10 U1.11 U2.1 U4.2 U4.8 U5.2 U6.10 U6.11 U7.4 U8.10 U8.11 U9.1 U10.10 U10.11 U11.1 U12.12 U12.31 U12.47 U12.63 U13.4 U14.4 U15.3 U16.3 U17.3 U18.3 U20.4 U21.4 U22.3 U23.3 U24.3 U25.3 U27.3 U28.3 U29.3 U30.3 U31.4 U32.4 U35.3 U36.3 U37.3 U38.3 U39.4 U40.4 U41.10 U41.11 U42.10 U42.11 VD1.2 VD18.2 X1.4 | length 1145.1
  Top Layer w0.3: v1(33.314,42.073) 33.314,41.079 C24.2@33.317,41.076
  Top Layer w0.5: X1.4@93.332,7.493 105.214,19.375 139.751,19.375 145.139,13.987 145.975,13.987 146.675,13.287 C33.2@146.675,12.451 146.675,11.451 147.375,10.751 147.539,10.751 148.115,10.175 v1(151.9,10.175) ; C126.1@106.54,211.758 106.545,211.764 R147.1@108.315,211.764 R146.1@110.095,211.764 C127.1@111.815,211.764 ; C155.1@106.564,60.205 R173.1@108.34,60.205 111.824,60.205 113.198,60.205 113.558,60.565 114.684,60.565 U39.4@114.699,60.58 ; C159.1@106.623,181.879 106.678,181.824 113.233,181.824 113.558,182.149 U40.4@114.678,182.149 ; C64.1@106.683,244.012 106.693,244.022 R73.1@108.473,244.022 113.512,244.022 113.788,244.297 114.882,244.297 U13.4@114.887,244.303 ; C124.1@106.734,88.555 113.224,88.555 113.519,88.85 U31.4@114.769,88.85 ; C97.1@106.847,274.603 R108.1@108.667,274.603 R107.1@110.45,274.603 C98.1@112.22,274.603 113.175,274.603 113.44,274.868 U21.4@114.815,274.868 ; C95.1@107.144,150.079 108.904,150.079 R106.1@108.934,150.049 R105.1@110.654,150.049 110.684,150.079 C96.1@112.404,150.079 113.564,150.079 113.829,150.344 U20.4@114.939,150.344 ; C127.1@111.82,211.759 112.979,211.759 113.249,212.029 U32.4@114.625,212.029
  Top Layer w0.6: 2.007,37.399 2.047,37.439 ; D3.2@22.081,5.526 D2.2@25.081,5.526 D1.2@28.081,5.526 42.206,5.526 D4.2@42.231,5.551 44.101,5.551 45.947,7.397 P9.2@45.947,17.456 41.317,17.456 J49.6@41.277,17.496
  Top Layer w1: J48.6@2.047,47.332 2.047,37.439 2.047,26.367 J52.6@2.082,26.332 2.082,24.105 5.555,20.632 P11.4@7.162,20.632 ; v2(2.52,107.709) 2.52,115.199 v2(5.74,118.419) 9.051,115.108 9.051,114.129 9.551,113.629 C38.2@9.877,113.629 ; v2(17.025,144.35) 17.025,276.7 23.9,283.575 87.125,283.575 93.5,277.2 ; v1(35.007,34.796) C23.2@35.007,35.798 ; v2(93.5,63.771) v2(93.5,90.001) v3(93.5,122.925) v2(93.5,153.725) v2(93.5,185.325) v2(93.5,216.106) v1(93.5,247.95) 93.5,277.2 ; v2(97.55,63.775) v2@97.6,63.775 ; C97.1@106.847,274.603 106.822,274.603 106.622,274.803 106.622,274.828 104.25,277.2 93.5,277.2 ; D8.2@158.918,28.417 158.958,28.377 v1(158.958,27.307)
  Top Layer w2: J9.1@9.5,127.5 18.329,136.329 38.36,136.329 46.65,144.619 U1.11@46.65,148.815 ; U6.11@46.65,274.815 U42.11@46.65,198.815 U1.11@46.65,148.815 ; U6.10@49.19,274.815 U42.10@49.19,198.815 49.19,148.815 U1.10@49.13,148.815 U1.11@46.65,148.815
  Bottom Layer w0.3: U12.47@31.007,42.576 31.009,42.574 32.024,42.574 32.526,42.072 33.313,42.072 v1(33.314,42.073) ; v1(40.229,37.694) 40.237,37.702 40.839,37.702 40.965,37.576 U12.12@42.507,37.576
  Bottom Layer w0.6: v2(2.52,107.709) C41.2@2.52,108.749 4.422,108.749 cw(c4.422,108.149) 4.845,108.574 5.71,107.709 U7.4@5.735,107.184 5.735,106.053 cw(c5.135,106.053) 5.614,105.692 5.105,105.016 C36.2@5.005,104.691 5.005,101.734 D10.2@4.98,101.709 ; R57.1@5.74,117.369 v2(5.74,118.419) ; C53.1@24.31,85.919 U11.1@26.72,85.919 26.72,87.689 27.57,88.539 C54.1@29.29,88.539 ; C56.2@47.627,39.913 v3(47.627,40.831) C55.2@47.627,41.749 ; C1.1@59.522,17.957 R4.2@59.522,19.787 62.722,19.787 P1.1@62.842,19.667 ; R30.1@59.757,46.131 P5.1@62.917,46.131 ; C3.1@59.823,35.552 R6.2@59.823,37.384 62.851,37.384 P3.1@62.893,37.342 ; C2.1@59.826,26.832 R5.2@59.826,28.62 62.89,28.62 P2.1@62.943,28.567 ; R29.1@60.187,54.961 P4.1@62.867,54.961 ; C25.1@86.703,18.755 86.928,18.755 87.5,19.327 87.5,19.329 87.926,19.755 U5.2@90.83,19.755 93.974,19.755 94.325,20.107 94.325,20.655 94.425,20.755 R52.2@94.65,20.755 94.656,20.749 C28.1@96.469,20.749 ; v1(151.9,10.175) 158.126,10.175 U2.1@159.948,11.997 159.948,13.507 160.688,14.247 160.688,17.782 ; R40.1@155.528,25.402 U4.8@158.593,25.402 ; U4.2@158.593,17.782 160.688,17.782 ; v1(158.958,27.307) 158.958,25.448 158.912,25.402 U4.8@158.593,25.402 ; U4.8@158.593,25.402 158.612,25.383 159.687,25.383 160.688,24.382 160.688,17.782
  Bottom Layer w1: v2(5.74,118.419) 7.321,120 12.025,120 14.4,122.375 20.95,122.375 C47.2@22.475,123.9 24.5,125.925 27.962,125.925 29.73,127.693 29.73,130.057 29.207,130.58 22.695,130.58 17.025,136.25 v2(17.025,144.35) ; v2(93.5,63.771) 93.504,63.775 v2(97.55,63.775) ; v2(93.5,90.001) 93.511,90.012 v2(97.351,90.012) ; v3(93.5,122.925) v2(96.95,122.925) ; v2(93.5,153.725) 93.516,153.709 v2(97.694,153.709) ; v2(93.5,185.325) v3(96.65,185.325) ; v2(93.5,216.106) 93.541,216.147 v2(97.737,216.147) ; v1(93.5,247.95) v3(96.9,247.95)
  Bottom Layer w2: J9.1@9.5,127.5 18.875,127.5 C47.2@22.475,123.9
  other v1: 41.375,46.425
  other v3: 25.982,30.943 43.104,33.67 97.283,56.701 73.9,57.8 101.801,59.893 97.25,85.55 101.757,88.512 97.348,116.784 102.381,120.608 97.694,146.563 102.376,150.15 96.462,177.834 101.745,181.836 97.552,208.5 101.687,211.199 96.751,239.906 101.796,243.636 97.026,271.086 101.698,271.61 102.202,274.263 97.187,278.732
  other v5: 32.675,38.576 45.037,45.096 28.575,45.275
  other v6: 1.375,19
GND_2: C9.2 J8.2 R38.1 R41.1 TP20.1 U2.3 U3.5 U4.9 U4.15 ZD1.2 ZD2.2 | length 71.1
  Top Layer w1: U2.3@165.028,11.997 167.635,14.604 170.377,14.604 179.445,23.672 v1(182.758,23.672) 183.358,23.672 ; TP20.1@183.428,28.767 183.428,23.742 183.358,23.672 ; J8.2@192.388,21.627 185.403,21.627 183.358,23.672
  Bottom Layer w0.5: C9.2@165.896,14.072 165.896,17.782 ; R38.1@167.838,27.637 167.843,27.632 U4.9@167.843,25.402 167.816,25.375 166.364,25.375 165.896,24.907 165.896,17.782 ; U4.15@167.843,17.782 165.896,17.782 ; U3.5@181.153,23.672 v1(182.758,23.672) ; ZD2.2@187.301,19.699 ZD2.2@187.388,19.612
  Bottom Layer w1: U2.3@165.028,11.997 165.896,12.865 C9.2@165.896,14.072 ; R41.1@184.958,20.587 184.958,20.612 185.158,20.812 185.183,20.812 185.998,21.627 187.301,21.627 ; ZD2.2@187.301,19.699 187.301,21.627 ; ZD1.2@187.301,23.437 187.301,21.627 ; J8.2@192.388,21.627 187.301,21.627
GND_-24V_1: C57.1 C58.2 C61.2 C62.1 U10.3 U10.4 U13.14 VD4.2 | length 102.9
  Top Layer w0.5: U13.14@124.637,245.573 123.195,245.573 122.902,245.865 122.902,248.716 128.461,254.276 C58.2@131.322,254.276
  Top Layer w1: v2(131.3,256.9) 131.3,254.298 C58.2@131.322,254.276 131.322,253.768 131.822,253.268 v2(132.972,253.268)
  Bottom Layer w1: U10.4@64.39,248.815 U10.3@66.93,248.815 66.93,251.03 72.8,256.9 v2(131.3,256.9) ; v2(132.972,253.268) 132.972,252.218 C57.1@132.942,252.188 135.42,252.188 135.715,252.483 136.006,252.483 136.606,253.083 C61.2@136.606,253.233 136.606,255.883 137.481,256.758 VD4.2@137.481,256.931 137.494,256.943 139.044,256.943 C62.1@139.056,256.955